# Altium PCB Ellis Huber Wearable device_CPU.PcbDoc (part 1 of 3)
Units mm, origin at the board's own origin, x right, y up, seen from the top; angles counter-clockwise.
Board outline 45 x 35 mm, 4 copper layers (Top Layer, Ground, Power, Bottom Layer), stack 1.586 mm thick; 117 components, 85 nets, 387 pads, 159 vias.
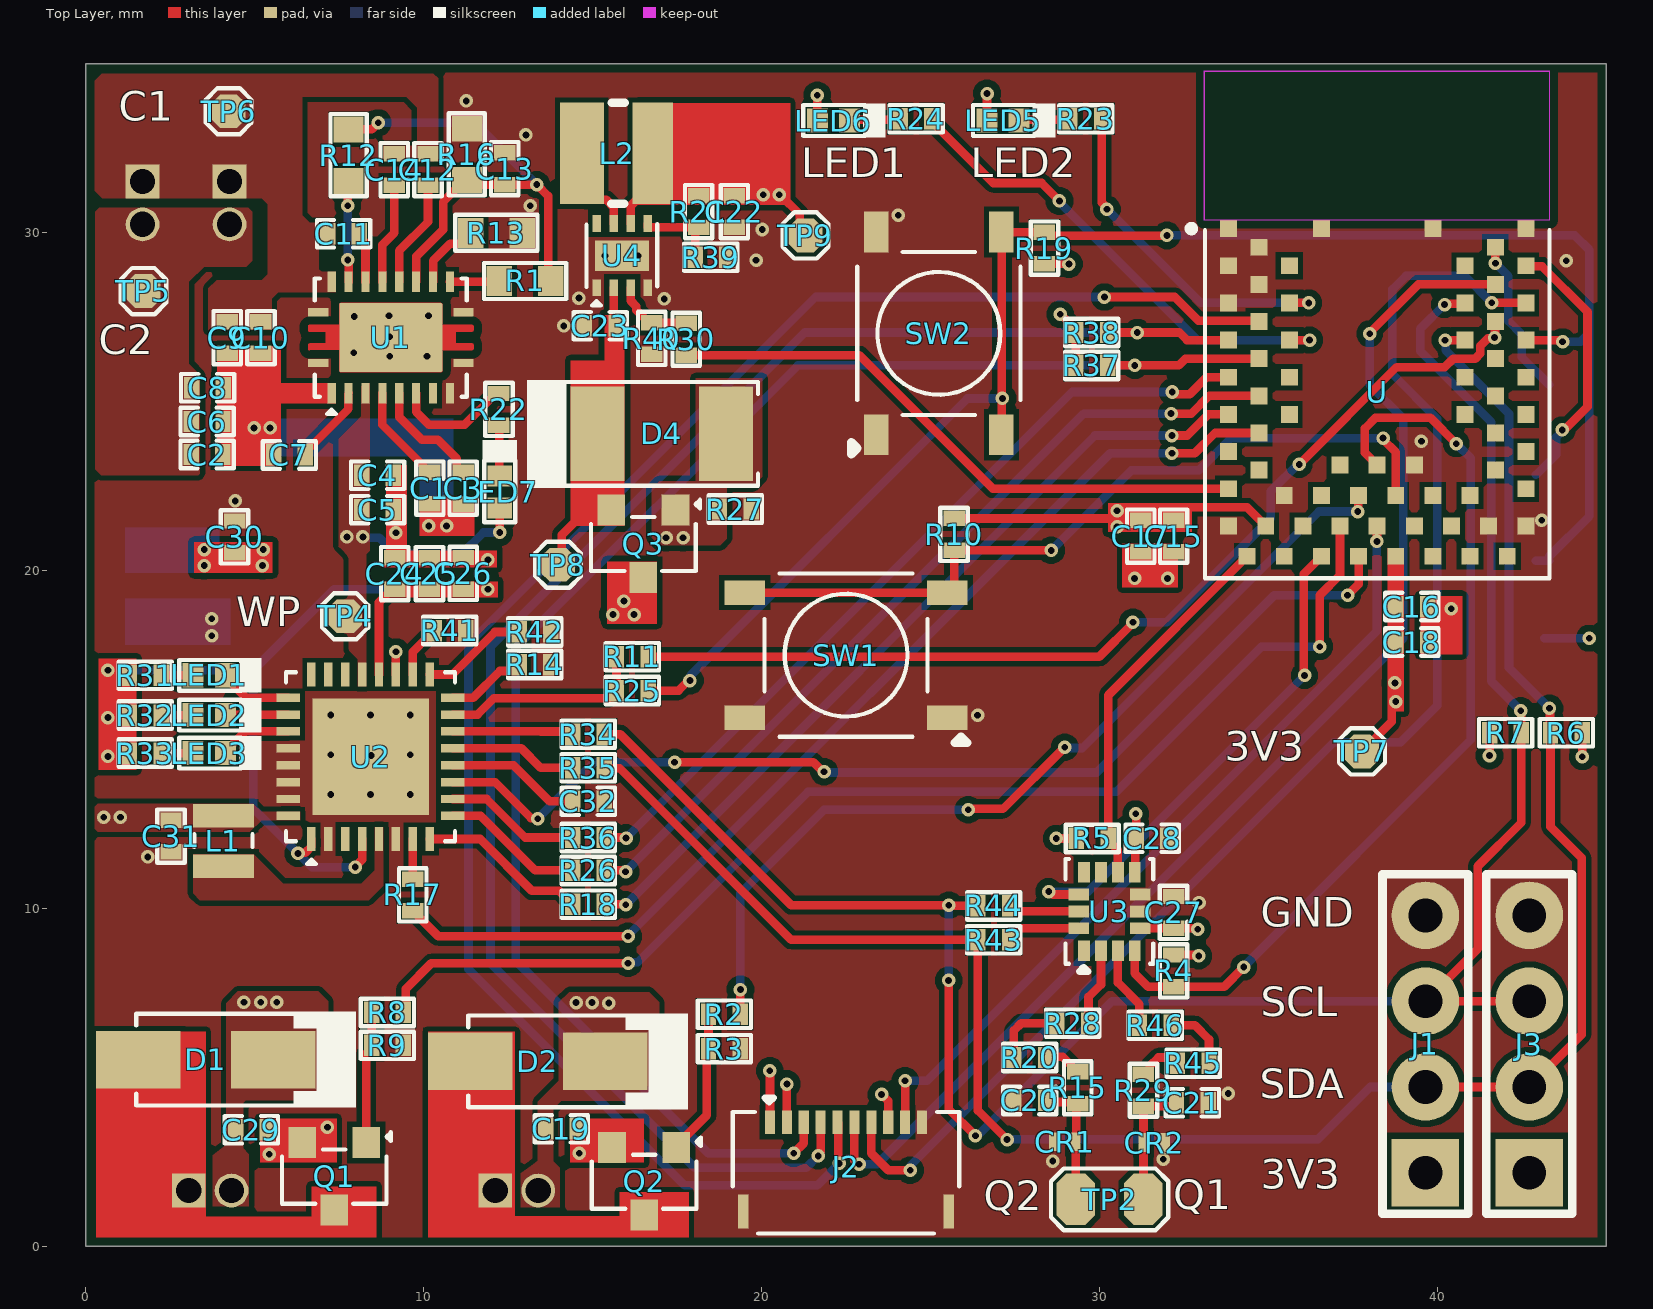
[diagram p0: Top Layer view]
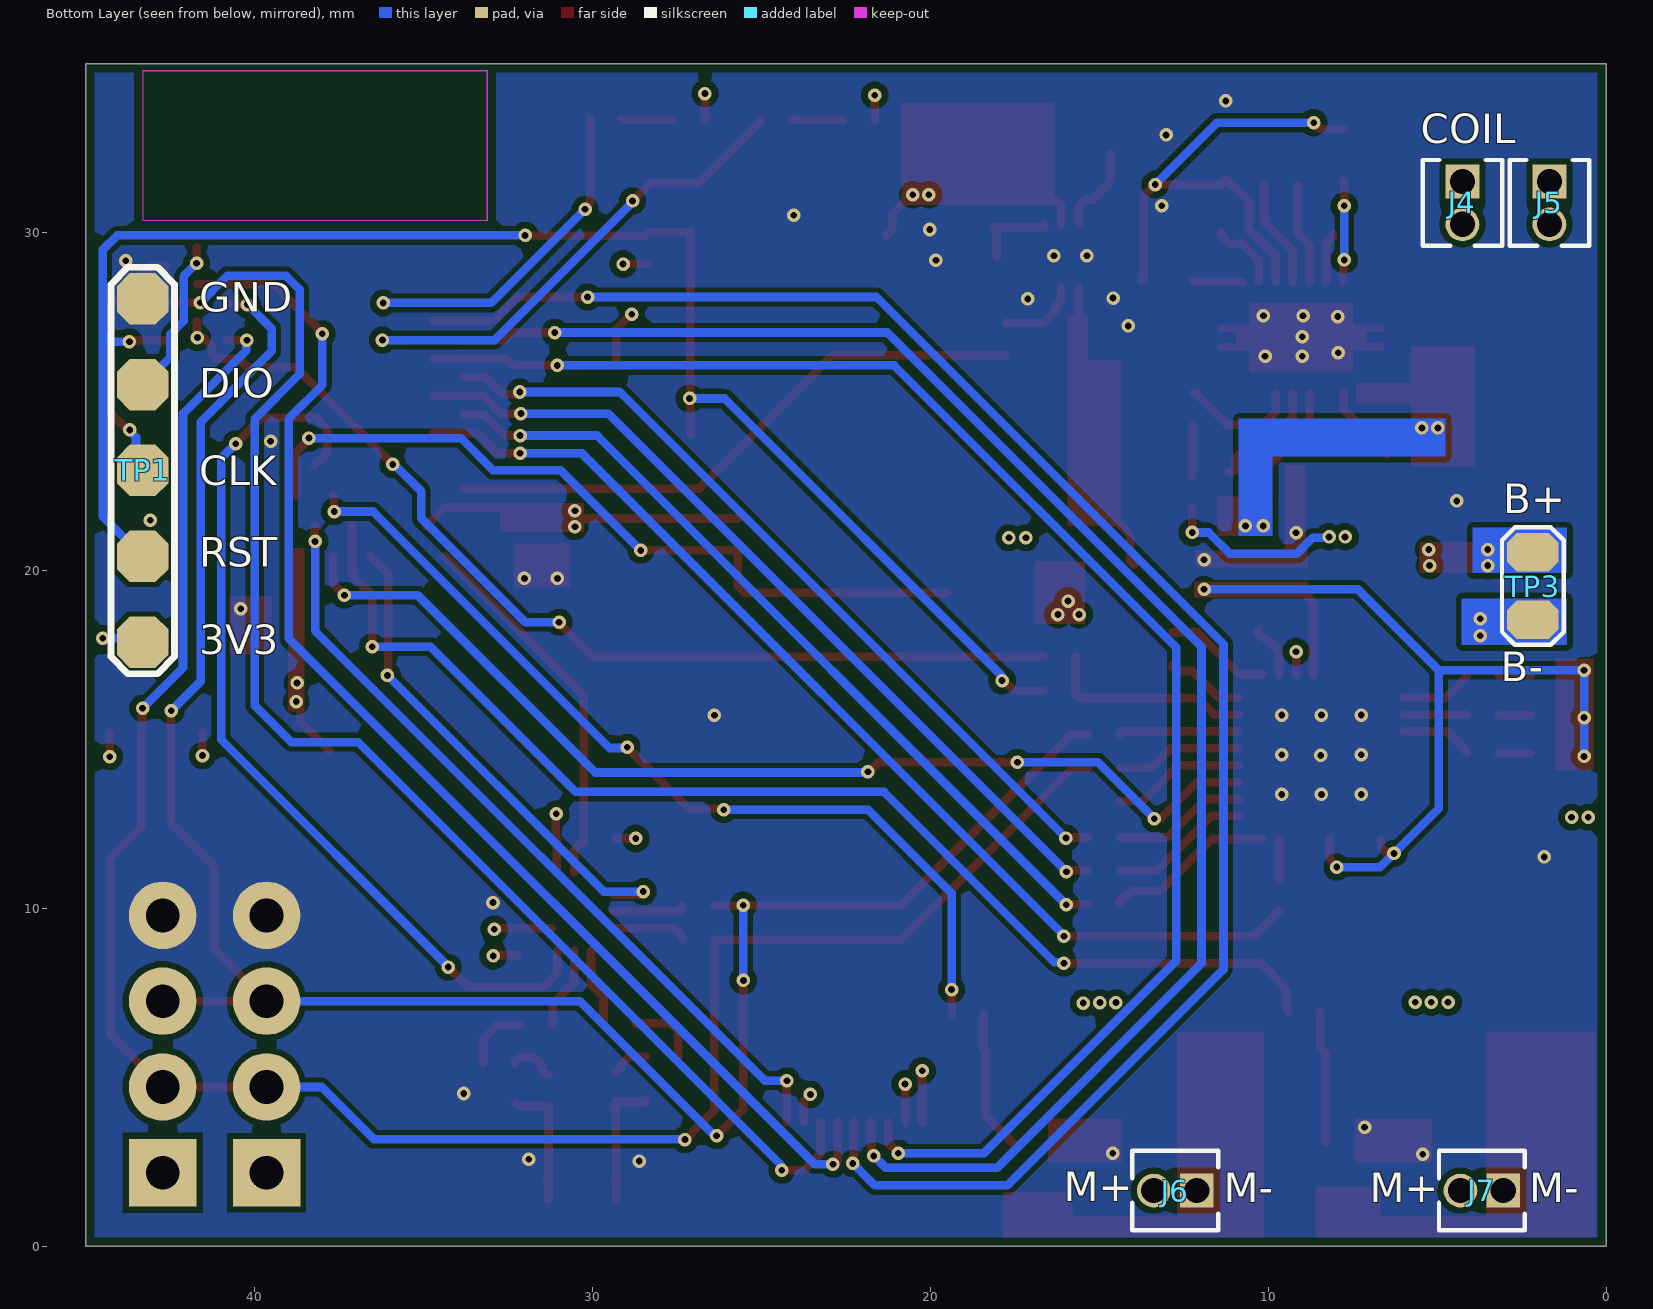
[diagram p1: Bottom Layer view, seen from below]
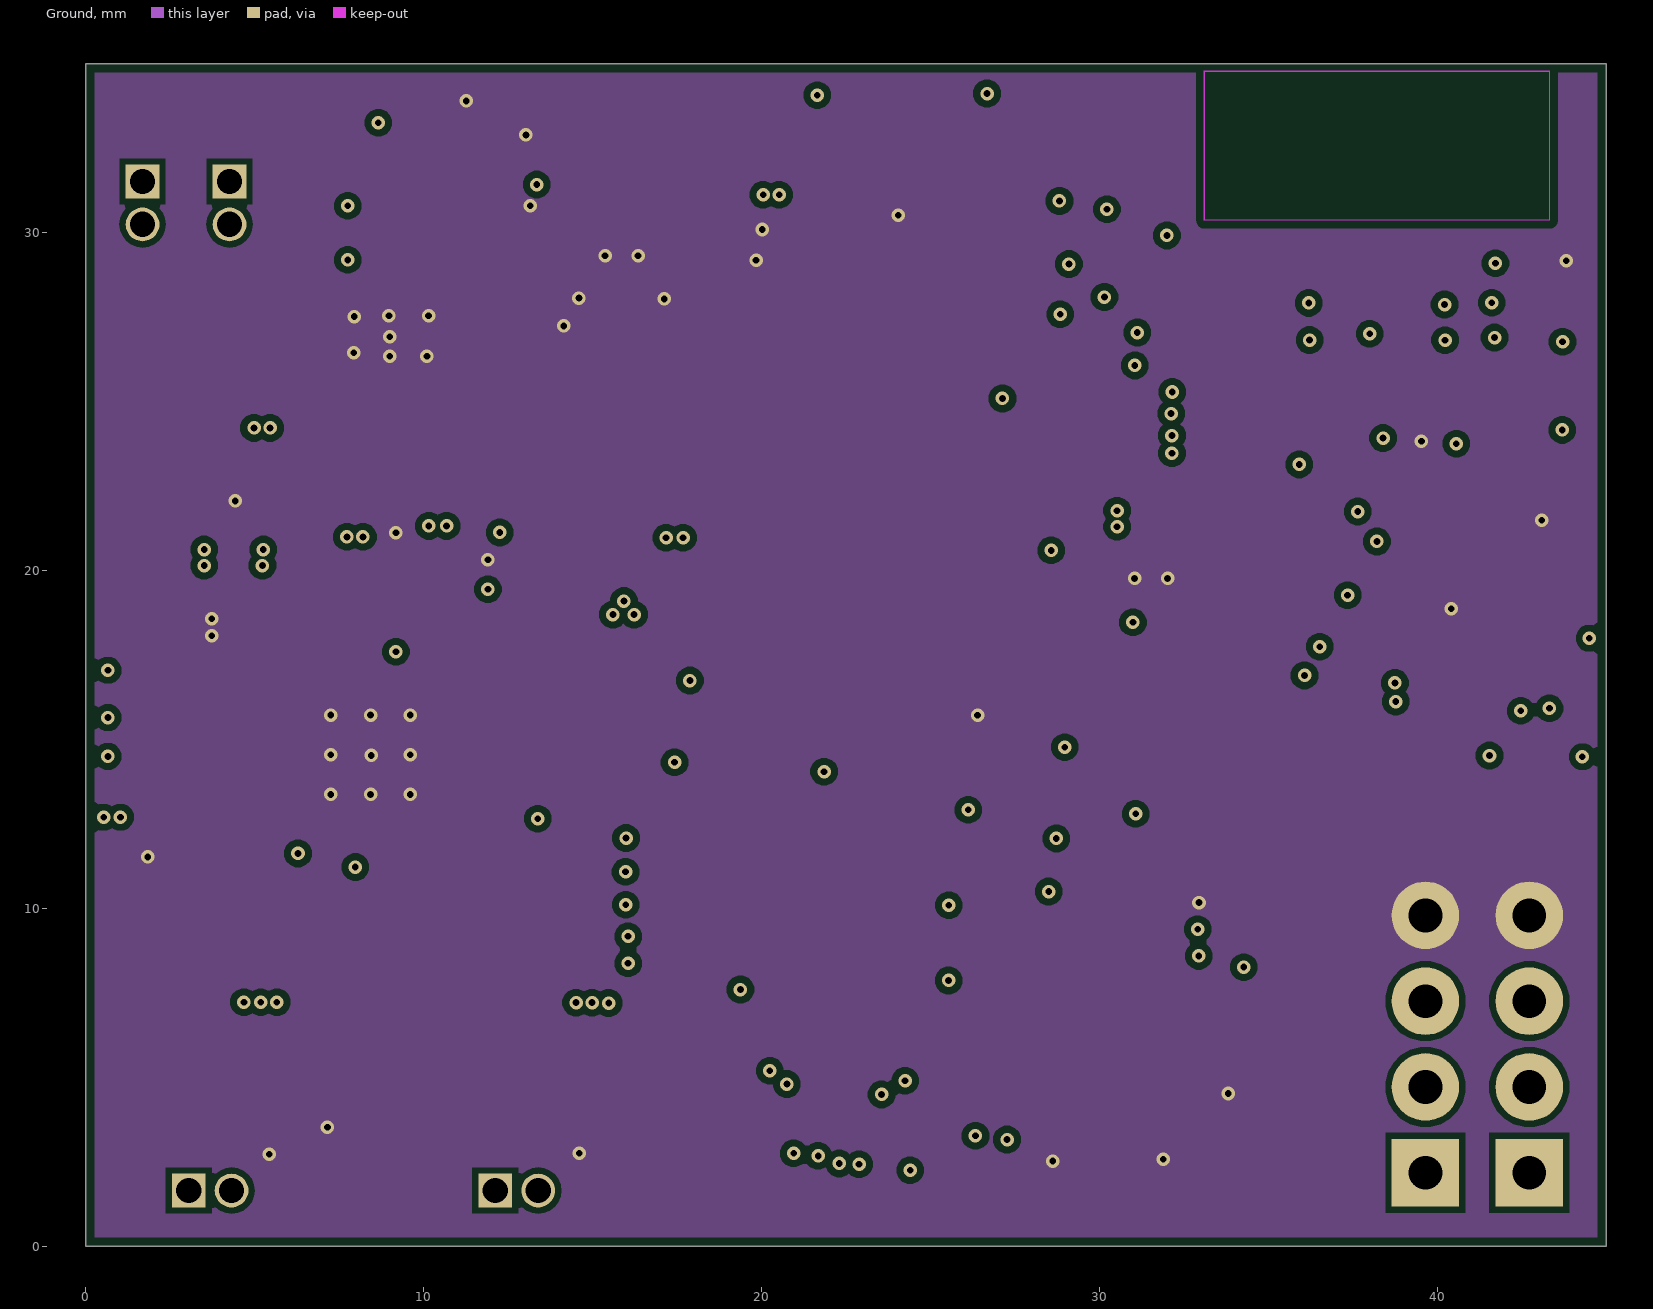
[diagram p2: Ground]
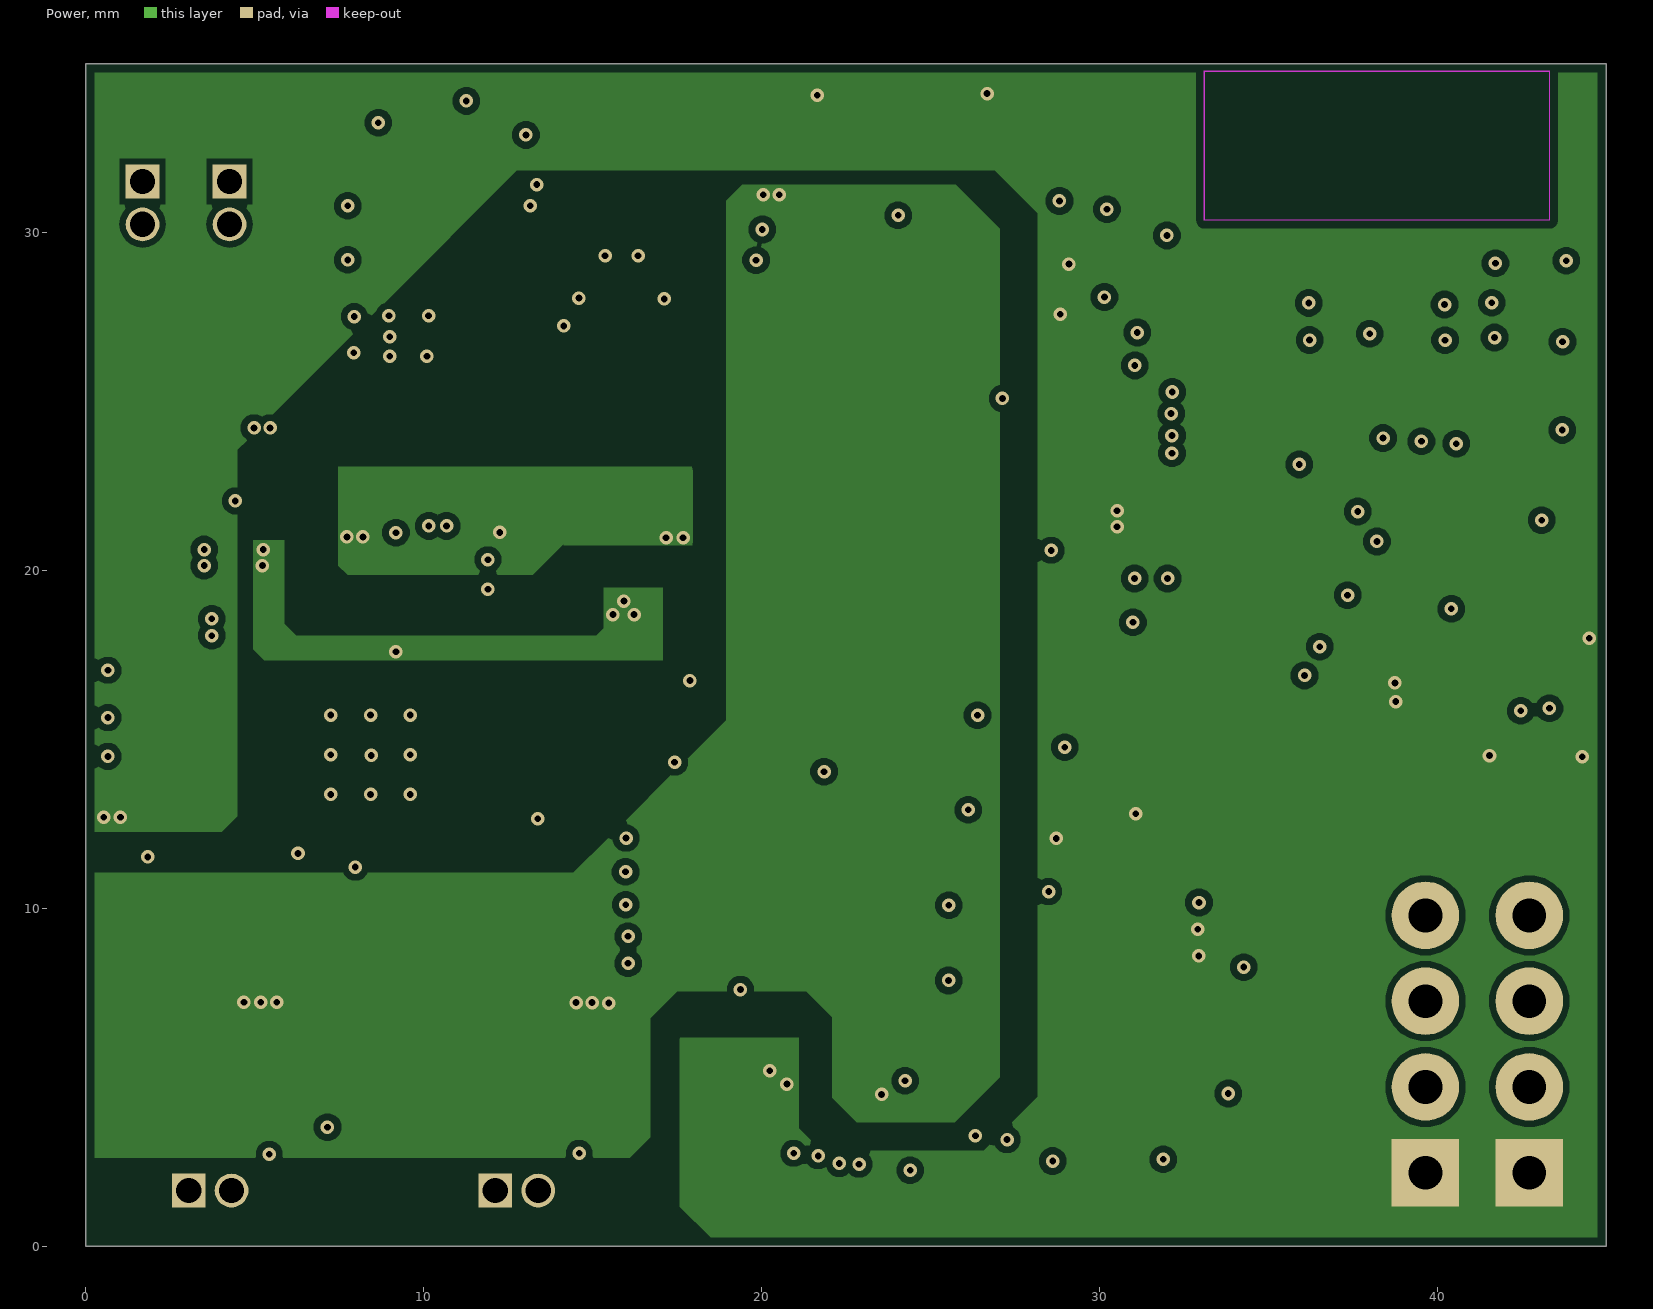
[diagram p3: Power]
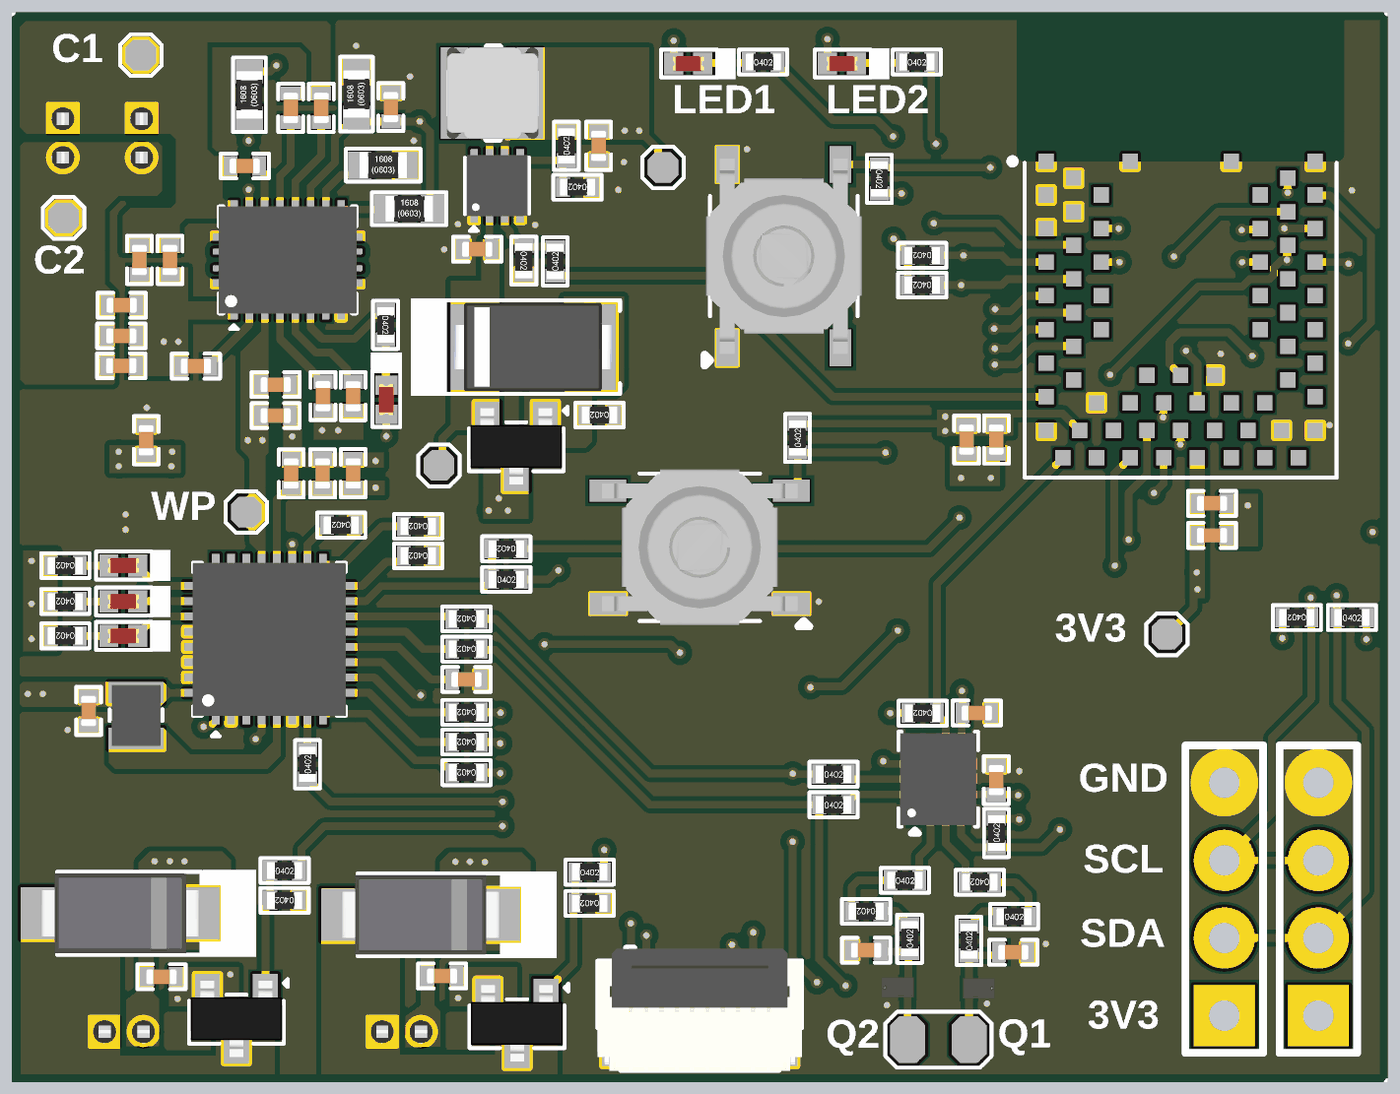
[diagram p5: 3D render of the assembled board from above, using the file's embedded part models]
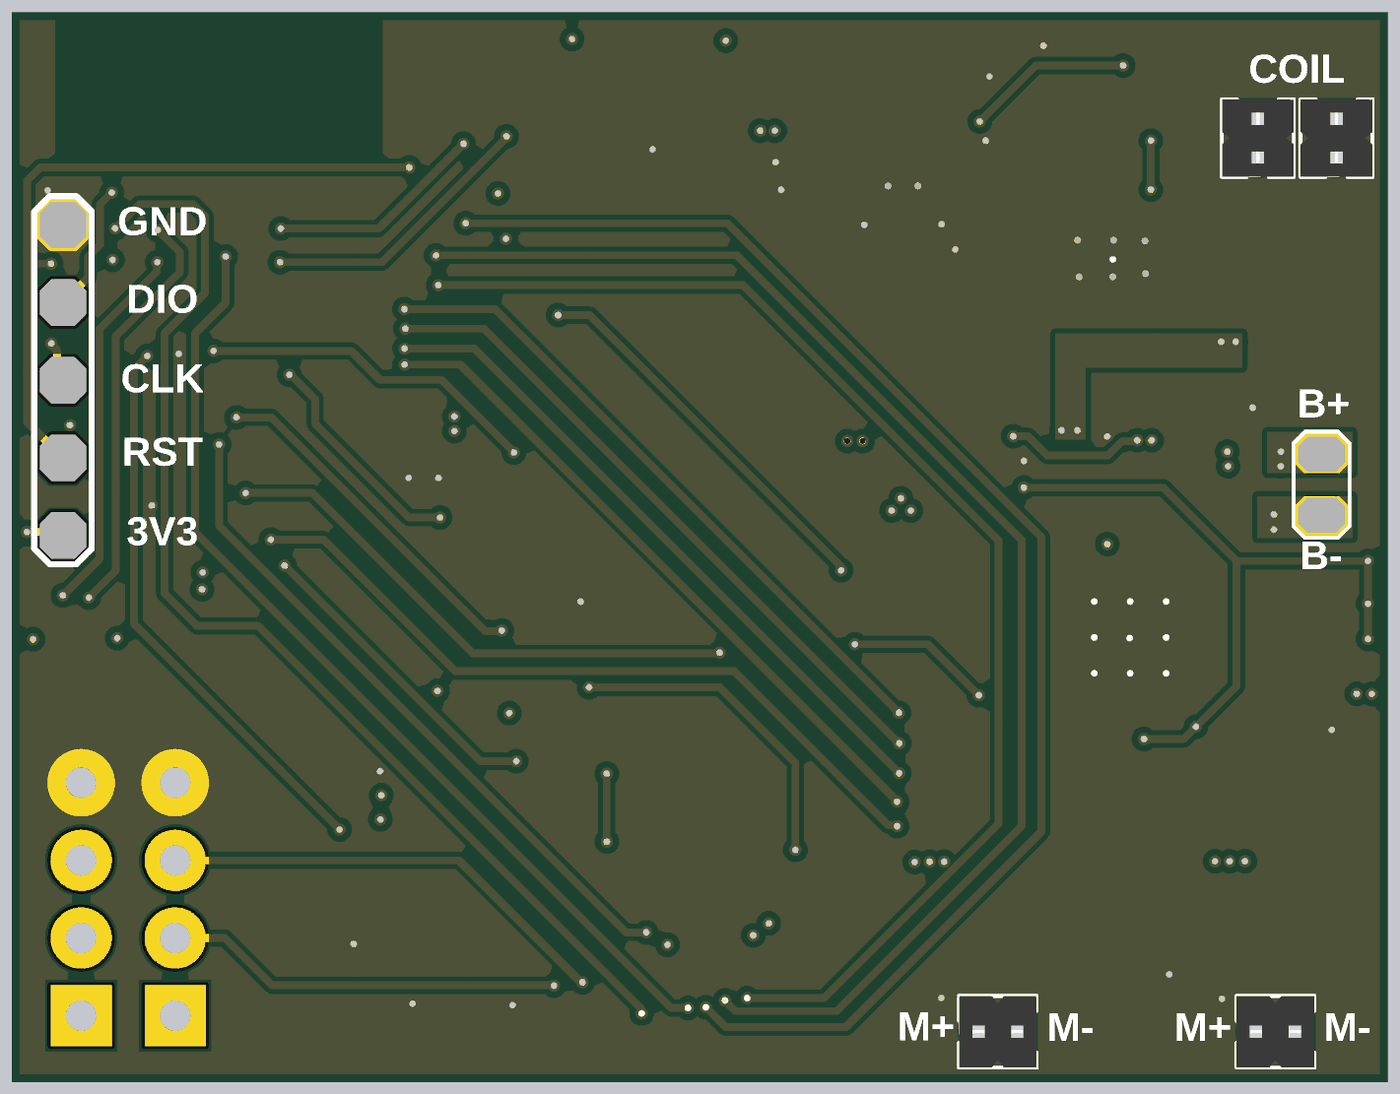
[diagram p6: 3D render of the assembled board from below, using the file's embedded part models]

## Layer stack, top to bottom
Top Solder: solder mask 0.0102, Solder Resist, Dk 3.8
Top Layer: signal copper 0.035
Dielectric 2: prepreg 0.2104, PP-006, Dk 4.4
Ground: signal copper 0.0152
Dielectric 1: core 1.065, FR-4, Dk 4.6
Power: signal copper 0.0152
Dielectric 3: prepreg 0.2104, PP-006, Dk 4.4
Bottom Layer: signal copper 0.035
Bottom Solder: solder mask 0.0102, Solder Resist, Dk 3.8

## Board outline
0,0 0,35 45,35 45,0

## Design rules (kind name [scope] priority, off if disabled: settings)
BoardOutlineClearance [All] p1: gap=0 ignorepadtopadclearanceinfootprint=FALSE except(0.254: Fill-OutlineEdge Poly-OutlineEdge Region-OutlineEdge)
Clearance [All] p1: gap=0.254 ignorepadtopadclearanceinfootprint=FALSE except(0: Arc-Hole Track-Hole SMDPad-Hole THPad-Hole Via-Hole Fill-Hole Poly-Hole Region-Hole Text-Hole; 0.127: Arc-SMDPad Arc-Text Track-SMDPad SMDPad-SMDPad SMDPad-Fill Via-Fill Region-Region Text-Text; 0.152: Arc-Arc Arc-Track Arc-Poly Track-Track Track-Poly SMDPad-Poly Fill-Poly Poly-Poly; 0.178: Arc-Via Arc-Region Track-Via SMDPad-Via THPad-Via THPad-Poly Via-Via; 0.203: Via-Poly)
ComponentClearance [All] p1: gap=0 collisioncheckmode=3 verticalgap=0 showdistances=FALSE
MinimumSolderMaskSliver [All] p1: minsoldermaskwidth=0.025
PlaneConnect [All] p1: planeconnectstyle=Direct reliefexpansion=0.508 reliefentries=4 reliefconductorwidth=0.254 reliefairgap=0.254
PolygonConnect [All] p1: connectstyle=Direct reliefconductorwidth=0.254 reliefentries=4 polygonreliefangle="90 Angle" airgapwidth=0.254
RoutingVias [All] p1: holewidth=0.2 width=0.4 viastyle="Through Hole" minholewidth=0.2 minwidth=0.4 maxholewidth=0.2 maxwidth=0.4
SilkToSilkClearance [All] p1: silktosilkclearance=0
SilkToSolderMaskClearance [IsPad] p1: minsilkscreentomaskgap=0.003 clearancetoexposedcopper=TRUE
SolderMaskExpansion [All] p1: expansion=0.102 istentingtop=FALSE
SupplyNets "Schematic Supply Nets_4" [InNet('W_Power')] p1: voltage=0.000
SupplyNets "Schematic Supply Nets_3" [InNet('BAT+')] p2: voltage=0.000
SupplyNets "Schematic Supply Nets_2" [InNet('VOS')] p3: voltage=0.000
SupplyNets "Schematic Supply Nets_1" [InNet('+3V3')] p4: voltage=0.000
SupplyNets "Schematic Supply Nets" [InNet('GND')] p5: voltage=0.000
Width [All] p1: maxlimit=0.762 minlimit=0.127 preferedwidth=0.254 midlayer2_maxwidth=0.254 bottomlayer_minwidth=0.254 bottomlayer_maxwidth=0.254 minimp=50.000000 maximp=50.000000 favimp=50.000000
25 further rules are at their usual default settings.

## Classes and differential pairs
component class Wireless_Charging: C1 C2 C3 C4 C5 C6 C7 C8 C9 C10 C11 C12 C13 C14 J4 J5 LED7 R1 R12 R13 R16 R22 TP4 TP5 TP6 U1
component class Power_Management: C22 C23 C24 C25 C26 C30 C31 C32 D4 L1 L2 LED1 LED2 LED3 Q3 R14 R21 R27 R30 R31 R32 R33 R34 R35 R39 R40 R41 R42 TP3 TP8 TP9 U2 U4
component class Motor_Driver: C19 C29 D1 D2 J6 J7 Q1 Q2 R2 R3 R8 R9
component class MCU: C15 C16 C17 C18 J1 J2 J3 LED5 LED6 R6 R7 R10 R11 R17 R18 R19 R23 R24 R25 R26 R36 R37 R38 SW1 SW2 TP1 TP7 U
component class IMU: C20 C21 C27 C28 CR1 CR2 R4 R5 R15 R20 R28 R29 R43 R44 R45 R46 TP2 U3

## Components (designator, comment, footprint, x,y, rotation, side; value= is the part's Value field where it differs from the comment)
C1 "470nF" Cap-0402 10.181,22.445 r90 top
C2 "68nF" Cap-0402 3.584,23.438 r0 top
C3 "22nF" Cap-0402 11.166,22.442 r90 top
C4 "0.1uF" Cap-0402 8.633,22.822 r180 top
C5 "1uF" Cap-0402 8.633,21.806 r180 top
C6 "68nF" Cap-0402 3.587,24.415 r0 top
C7 "10nF" Cap-0402 6.025,23.425 r0 top
C8 "47nF" Cap-0402 3.601,25.417 r0 top
C9 "1.8nF" Cap-0402 4.181,26.9 r270 top
C10 "100pF" Cap-0402 5.181,26.9 r270 top
C11 "10nF" Cap-0402 7.625,29.975 r0 top
C12 "22nF" Cap-0402 10.125,31.875 r270 top
C13 "0.1uF" Cap-0402 12.4,31.9 r270 top
C14 "470nF" Cap-0402 9.125,31.875 r270 top
C15 "0.1uF" Cap-0402 32.2,21.025 r90 top
C16 "0.1uF" Cap-0402 39.25,18.935 r180 top
C17 "4.7uF" Cap-0402 31.225,21.025 r90 top
C18 "4.7uF" Cap-0402 39.25,17.885 r180 top
C19 "0.1uF" Cap-0402 14.075,3.475 r180 top
C20 "100pF" Cap-0402 27.94,4.318 r0 top
C21 "100pF" Cap-0402 32.754,4.249 r180 top
C22 "22uF" Cap-0402 19.195,30.632 r90 top
C23 "10uF" Cap-0402 15.225,27.25 r0 top
C24 "10uF" Cap-0402 9.143,19.914 r270 top
C25 "10uF" Cap-0402 10.168,19.914 r270 top
C26 "10uF" Cap-0402 11.168,19.919 r270 top
C27 "0.1uF" Cap-0402 32.196,9.884 r270 top
C28 "0.1uF" Cap-0402 31.559,12.077 r180 top
C29 "0.1uF" Cap-0402 4.9,3.45 r180 top
C30 "2.2uF" Cap-0402 4.4,21 r270 top
C31 "10uF" Cap-0402 2.518,12.144 r90 top
C32 "0.1uF" Cap-0402 14.875,13.175 r180 top
CR1 "ESDALCL5-1BM2" CR_L5-1BM2_STM 28.976,3.093 r0 top
CR2 "ESDALCL5-1BM2" CR_L5-1BM2_STM 31.626,3.068 r180 top
D1 "SS24A" SMA 3.55,5.525 r180 top
D2 "SS24A" SMA 13.375,5.475 r180 top
D4 "SS14" SMA(DO-214AC) 17.05,24.05 r0 top
J1 "DNP" "4P Through Hole Pads" 39.704,3.979 r90 top
J2 "503480-1000" 5034801000 22.5,2.35 r0 top
J3 "DNP" "4P Through Hole Pads" 42.778,3.979 r90 top
J4 "COIL2" "HDR 1x2 Male 1.27mm" 4.25,30.885 r270 bottom
J5 "COIL1" "HDR 1x2 Male 1.27mm" 1.675,30.885 r270 bottom
J6 "VL91022-160-320H" "HDR 1x2 Male 1.27mm" 12.753,1.65 r0 bottom
J7 "VL91022-160-320H" "HDR 1x2 Male 1.27mm" 3.675,1.65 r0 bottom
L1 "2.2uH" MAKK2016T2R2M_ 4.068,11.994 r270 top
L2 "2.2uH" NR3015T2R2M 15.729,32.358 r0 top
LED1 "Red" LED-0402 3.65,16.9 r0 top
LED2 "Red" LED-0402 3.65,15.725 r0 top
LED3 "Red" LED-0402 3.65,14.6 r0 top
LED5 "Red" LED-0402 27.15,33.325 r0 top
LED6 "Red" LED-0402 22.125,33.325 r0 top
LED7 "Red" LED-0402 12.25,22.325 r90 top
Q1 "AO3400A" sot-23 7.35,2.075 r180 top
Q2 "AO3400A" sot-23 16.525,1.925 r180 top
Q3 "AO3401" SOT-23 16.5,20.8 r180 top
R1 "110R" Res-0603 13,28.575 r180 top value=1R
R2 "100R" Res-0402 18.9,6.87 r0 top
R3 "100K" Res-0402 18.9,5.85 r180 top
R4 "10K" Res-0402 32.2,8.152 r90 top
R5 "10K" Res-0402 29.791,12.071 r180 top
R6 "10K" Res-0402 43.825,15.2 r0 top
R7 "10K" Res-0402 42.025,15.2 r180 top
R8 "100R" Res-0402 8.925,6.923 r0 top
R9 "100K" Res-0402 8.925,5.948 r180 top
R10 "10K" Res-0402 25.7,21.075 r90 top
R11 "0R" Res-0402 16.175,17.45 r180 top
R12 "42.2k" Res-0603 7.775,32.3 r270 top value=1R
R13 "10K" Res-0603 12.15,30 r180 top value=10kR
R14 "330K" Res-0402 13.293,17.219 r180 top value=330kR
R15 "200R" Res-0402 29.362,4.692 r90 top
R16 "200R" Res-0603 11.275,32.325 r270 top
R17 "0R" Res-0402 9.675,10.4 r90 top
R18 "0R" Res-0402 14.875,10.125 r180 top
R19 "10K" Res-0402 28.375,29.55 r270 top
R20 "200R" Res-0402 27.94,5.588 r180 top
R21 "1K" Res-0402 18.138,30.632 r90 top value=1kR
R22 "220R" Res-0402 12.225,24.775 r270 top
R23 "220R" Res-0402 29.6,33.375 r0 top
R24 "220R" Res-0402 24.575,33.376 r0 top
R25 "0R" Res-0402 16.175,16.45 r0 top
R26 "0R" Res-0402 14.875,11.125 r180 top
R27 "100K" Res-0402 19.225,21.825 r180 top
R28 "100R" Res-0402 29.21,6.604 r0 top
R29 "200R" Res-0402 31.304,4.617 r90 top
R30 "1K" Res-0402 17.77,26.851 r90 top value=1kR
R31 "220R" Res-0402 1.755,16.9 r180 top
R32 "220R" Res-0402 1.755,15.725 r180 top
R33 "220R" Res-0402 1.755,14.6 r180 top
R34 "0R" Res-0402 14.875,15.16 r180 top
R35 "0R" Res-0402 14.875,14.167 r180 top
R36 "0R" Res-0402 14.875,12.1 r180 top
R37 "10K" Res-0402 29.775,26.075 r180 top
R38 "10K" Res-0402 29.775,27.05 r180 top
R39 "300K" Res-0402 18.502,29.279 r180 top
R40 "100K" Res-0402 16.75,26.875 r270 top
R41 "0R" Res-0402 10.775,18.225 r180 top
R42 "0R" Res-0402 13.293,18.185 r180 top
R43 "0R" Res-0402 26.875,9.075 r0 top
R44 "0R" Res-0402 26.875,10.075 r0 top
R45 "200R" Res-0402 32.777,5.417 r0 top
R46 "100R" Res-0402 31.657,6.542 r180 top
SW1 "PTS526SP15SMTR2LFS" "PTS526SP15SMTR2 LFS" 22.5,17.5 r180 top
SW2 "PTS526SP15SMTR2LFS" "PTS526SP15SMTR2 LFS" 25.25,27.025 r90 top
TP1 "SWD" "5 Test Pad" 43.32,17.885 r90 bottom
TP2 "Qvar" "2 Test Pad" 31.304,1.389 r180 top
TP3 "BAT CONN" "2 Test Pad" 2.168,20.544 r270 bottom
TP4 "TEST POINT 0.5mm Dia" "Test-point - 0.5mm" 7.675,18.65 r90 top
TP5 "TEST POINT 0.5mm Dia" "Test-point - 0.5mm" 1.7,28.275 r90 top
TP6 "TEST POINT 0.5mm Dia" "Test-point - 0.5mm" 4.225,33.6 r90 top
TP7 "TEST POINT 0.5mm Dia" "Test-point - 0.5mm" 37.775,14.65 r90 top
TP8 "TEST POINT 0.5mm Dia" "Test-point - 0.5mm" 13.975,20.175 r90 top
TP9 "TEST POINT 0.5mm Dia" "Test-point - 0.5mm" 21.3,29.925 r90 top
U "BMD-340-A-R" RIGADO_BMD-340-A-R 38.225,27.275 r270 top
U1 "BQ51013BRHLR" "20-VQFN (3.5x4.5)" 9.025,26.9 r90 top
U2 "NPM1300-QEAA-R" "32-QFN (5x5)" 8.425,14.49 r90 top
U3 "LSM6DSV16XTR" "14-LGA (2.5x3)" 30.299,9.912 r90 top
U4 "TPS62162DSGR" 8-WSON(2x2) 15.875,29.325 r90 top

## Footprints (in the part's own frame and the unit in brackets; to place one, negate y for a bottom-side part, rotate by r counter-clockwise, add the part's x,y. Pads: shape width x height; smd on the part's side, far side on the other; paste and mask are expansions set on the pad)
"2 Test Pad" [mil]
  oct 45x60 smd: 1(0,0) 2(78.74,0)
  silkscreen extent -29,-36 108,36
"4P Through Hole Pads" [mm]
  rect 2x2 hole 1: 1(-1.803,0.051)
  round 2 hole 1: 2(0.737,0.051) 3(3.277,0.051) 4(5.817,0.051)
  silkscreen extent -3.02,-1.22 7.04,1.32
"5 Test Pad" [mil]
  oct 60x60 smd: 1(0,0) 2(100,0) 3(200,0) 4(300,0) 5(400,0)
  silkscreen extent -37,-37 437,37
8-WSON(2x2) [mm] "IC REG BUCK 3.3V 1A 8WSON"
  rect 0.5x0.25 smd: 1(-0.95,0.75) 2(-0.95,0.25) 3(-0.95,-0.25) 4(-0.95,-0.75) 5(0.95,-0.75) 6(0.95,-0.25) 7(0.95,0.25) 8(0.95,0.75)
  rect 0.9x1.6 smd: 9(0,0)
  silkscreen extent -1.47,-1.04 0.93,1.05, body extent -1,-1 1,1, height 0.8
"14-LGA (2.5x3)" [mm]
  rect 0.61x0.35 smd mask+0.05: 1(-1.16,0.75) 2(-1.16,0.25) 3(-1.16,-0.25) 4(-1.16,-0.75) 8(1.16,-0.75) 9(1.16,-0.25) 10(1.16,0.25) 11(1.16,0.75)
  rect 0.35x0.61 smd mask+0.05: 5(-0.5,-0.91) 6(0,-0.91) 7(0.5,-0.91) 12(0.5,0.91) 13(0,0.91) 14(-0.5,0.91)
  silkscreen extent -1.78,-1.3 1.55,1.3, body extent -1.5,-1.25 1.5,1.25, height 0.86
"20-VQFN (3.5x4.5)" [mm]
  rect 0.24x0.6 smd: 1(-0.75,2.15) 10(-0.75,-2.15) 11(0.75,-2.15) 20(0.75,2.15)
  rect 0.6x0.24 smd: 2(-1.65,1.75) 3(-1.65,1.25) 4(-1.65,0.75) 5(-1.65,0.25) 6(-1.65,-0.25) 7(-1.65,-0.75) 8(-1.65,-1.25) 9(-1.65,-1.75) 12(1.65,-1.75) 13(1.65,-1.25) 14(1.65,-0.75) 15(1.65,-0.25) 16(1.65,0.25) 17(1.65,0.75) 18(1.65,1.25) 19(1.65,1.75)
  rrect5% 2.05x3.05 smd paste-3: 21(0,0)
  Top Layer region: 381 vertices and 0 holes, not listed, extent -1.025,-2.45 1.025,2.45
  silkscreen extent -2.26,-2.25 1.75,2.25, body extent -1.75,-2.25 1.75,2.25, height 1
"32-QFN (5x5)" [mm]
  rect 0.7x0.25 smd: 1(-2.435,1.75) 2(-2.435,1.25) 3(-2.435,0.75) 4(-2.435,0.25) 5(-2.435,-0.25) 6(-2.435,-0.75) 7(-2.435,-1.25) 8(-2.435,-1.75) 17(2.435,-1.75) 18(2.435,-1.25) 19(2.435,-0.75) 20(2.435,-0.25) 21(2.435,0.25) 22(2.435,0.75) 23(2.435,1.25) 24(2.435,1.75)
  rect 0.25x0.7 smd: 9(-1.75,-2.435) 10(-1.25,-2.435) 11(-0.75,-2.435) 12(-0.25,-2.435) 13(0.25,-2.435) 14(0.75,-2.435) 15(1.25,-2.435) 16(1.75,-2.435) 25(1.75,2.435) 26(1.25,2.435) 27(0.75,2.435) 28(0.25,2.435) 29(-0.25,2.435) 30(-0.75,2.435) 31(-1.25,2.435) 32(-1.75,2.435)
  rect 3.45x3.45 smd paste-3: 33(0,0)
  silkscreen extent -3.17,-2.5 2.5,2.5, body extent -2.5,-2.5 2.5,2.5, height 0.6
5034801000 [mm]
  rect 0.3x0.7 smd: 1(-2.25,1.325) 2(-1.75,1.325) 3(-1.25,1.325) 4(-0.75,1.325) 5(-0.25,1.325) 6(0.25,1.325) 7(0.75,1.325) 8(1.25,1.325) 9(1.75,1.325) 10(2.25,1.325)
  rect 0.3x1 smd: S1(-3.04,-1.325) S2(3.04,-1.325)
  silkscreen extent -3.35,-1.97 3.35,2.04, body extent -3.35,-1.98 3.35,2.02, height 1.02
Cap-0402 [mil]
  rect 18x25 smd mask+2.36: 1(-18.5,0) 2(18.5,0)
  silkscreen extent -31,-16 31,16, body extent -20,-10 20,10, height 19
CR_L5-1BM2_STM [mil]
  rect 12x22 smd paste+0 mask+0: 1(-12.5,0)
  rect 12x22 smd paste+0 mask-1: 2(12.5,0)
  body extent -21,-13 21,13, height 20
"HDR 1x2 Male 1.27mm" [mm]
  rect 1x1 hole 0.75 paste-2539.97 mask+0.051: 1(-0.635,0)
  round 1 hole 0.75 paste-2539.97 mask+0.051: 2(0.635,0)
  silkscreen extent -1.27,-1.18 1.27,1.18, body extent -1.27,-1.17 1.28,1.17, height 5.6
LED-0402 [mm]
  rect 0.62x0.72 smd: 1(-0.475,0) 2(0.475,0)
  silkscreen extent -0.89,-0.51 1.55,0.51, body extent -0.5,-0.25 0.51,0.25, height 0.45
MAKK2016T2R2M_ [mm]
  rect 0.7x1.8 smd: 1(-0.75,0) 2(0.75,0)
  silkscreen extent -0.2,-0.86 0.18,0.86, body extent -1,-0.8 1,0.8, height 1
NR3015T2R2M [mm]
  rect 1.3x3 smd paste+0 mask+0.051: 1(-1.05,0)
  rect 1.2x3 smd paste+0 mask+0.051: 2(1.05,0)
  silkscreen extent -0.18,-1.5 0.22,1.5, body extent -1.51,-1.5 1.51,1.5, height 1.51
"PTS526SP15SMTR2 LFS" [mm]
  rect 1.2x0.72 smd paste+0 mask+0.051: 1(-3,1.85) 2(3,1.85) 3(-3,-1.85) 4(3,-1.85)
  silkscreen extent -3.58,-2.41 2.41,2.59, body extent -3.2,-2.55 3.2,2.55, height 1.5
Res-0402 [mil]
  rect 18x25 smd mask+2.17: 1(-18.5,0) 2(18.5,0)
  silkscreen extent -32,-17 32,16, body extent -23,-11 23,11, height 16
Res-0603 [mil]
  rect 30x35 smd: 1(-30,0) 2(30,0)
  silkscreen extent -48,-21 48,21, body extent -31,-17 31,17, height 18
RIGADO_BMD-340-A-R [mm]
  rect 0.5x0.5 smd: 1(-2.85,-4.4) 2(-2.3,-3.5) 3(-1.75,-4.4) 4(-1.2,-3.5) 5(-0.65,-4.4) 6(-0.1,-3.5) 7(0.45,-4.4) 8(1,-3.5) 9(1.55,-4.4) 10(2.1,-3.5) 11(2.65,-4.4) 12(3.2,-3.5) 13(3.75,-4.4) 14(4.3,-3.5) 15(4.85,-4.4) 16(5.95,-4.4) 17(5.95,-3.3) 18(5.05,-2.75) 19(5.95,-2.2) 20(5.05,-1.65) 21(5.95,-1.1) 22(5.05,-0.55) 23(5.95,0) 24(5.05,0.55) 25(5.95,1.1) 26(5.05,1.65) 27(5.95,2.2) 28(5.05,2.75) 29(5.95,3.3) 30(5.95,4.4) 31(4.85,4.4) 32(4.3,3.5) 33(3.75,4.4) 34(3.2,3.5) 35(2.65,4.4) 36(2.1,3.5) 37(1.55,4.4) 38(1,3.5) 39(0.45,4.4) 40(-0.1,3.5) 41(-0.65,4.4) 42(-1.2,3.5) 43(-1.75,4.4) 44(-2.3,3.5) 45(-2.85,4.4) 46(-2.85,1.65) 47(-2.85,-1.65) 48(-1.75,-2.6) 49(-0.65,-2.6) 50(0.45,-2.6) 51(1.55,-2.6) 52(2.65,-2.6) 53(4.15,-1.1) 54(4.15,0) 55(4.15,1.1) 56(2.65,2.6) 57(1.55,2.6) 58(0.45,2.6) 59(-0.65,2.6) 60(-1.75,2.6) 61(6.85,-3.85) 62(6.85,-2.75) 63(6.85,-1.65) 64(6.85,-0.55) 65(6.85,0.55) 66(6.85,1.65) 67(6.85,2.75) 68(6.85,3.85)
  Keep-Out Layer region: -3.1,-5.113 -7.519,-5.113 -7.519,5.1 -3.1,5.1
  Keep-Out Layer region: -3.1,-5.108 -7.512,-5.108 -7.512,5.1 -3.1,5.1
  silkscreen extent -2.95,-5.6 7.5,5.1
SMA [mm]
  rect 2.5x1.7 smd: 1(-2,0) 2(2,0)
  silkscreen extent -4.45,-1.42 2.06,1.42, body extent -2.6,-1.3 2.6,1.3, height 2.4
SMA(DO-214AC) [mm]
  rect 1.6x2.8 smd: 1(-1.9,0) 2(1.9,0)
  silkscreen extent -3.99,-1.6 2.84,1.6, body extent -2.6,-1.45 2.6,1.45, height 2.3
sot-23 [mm] "TRANS NPN 40V 0.6A SOT23"
  rect 0.82x0.92 smd: 1(-0.95,-1) 2(0.95,-1) 3(0,1)
  silkscreen extent -1.68,-1.3 1.55,0.81, body extent -1.5,-1.25 1.5,1.25, height 1.05
SOT-23 [mm] "TRANS NPN 40V 0.6A SOT23"
  rect 0.82x0.92 smd: 1(-0.95,-1) 2(0.95,-1) 3(0,1)
  silkscreen extent -1.68,-1.3 1.55,0.81, body extent -1.5,-1.25 1.5,1.25, height 1.05
"Test-point - 0.5mm" [mm]
  oct 1x1 smd: 1(0,0)
  silkscreen extent -0.68,-0.68 0.68,0.68

## Part data
C1 C14: library part GRM155R61H474KE11D, "CAP CER 0.47UF 50V X5R 0402", Case Code (Imperial)=0402, Case Code (Metric)=1005, Dielectric=X5R, LCSC Part Number=C437527, Manufacturer=Murata, Max Operating Temperature=85°C, Min Operating Temperature=-55°C, Tolerance=10%, Voltage Rating=50V, Case/Package=0402, ComponentLink1Description=https://datasheet.octopart.com/GRM155R61H474KE11D-Murata-datasheet-149523035.pdf?src-supplier=Newark, ComponentLink1URL=https://datasheet.octopart.com/GRM155R61H474KE11D-Murata-datasheet-149523035.pdf?src-supplier=Newark, ComponentLink2Description=https://datasheet.octopart.com/GRM155R61H474KE11D-Murata-datasheet-99353828.pdf?src-supplier=Future+Electronics, ComponentLink2URL=https://datasheet.octopart.com/GRM155R61H474KE11D-Murata-datasheet-99353828.pdf?src-supplier=Future+Electronics, ComponentLink3Description=http://search.murata.co.jp/Ceramy/image/img/A01X/G101/ENG/GRM155R61H474KE11-01.pdf?src-supplier=Digikey, ComponentLink3URL=http://search.murata.co.jp/Ceramy/image/img/A01X/G101/ENG/GRM155R61H474KE11-01.pdf?src-supplier=Digikey, ComponentLink4Description=https://search.murata.co.jp/Ceramy/image/img/A01X/G101/ENG/GRM155R61H474KE11-01.pdf?src-supplier=Digikey, ComponentLink4URL=https://search.murata.co.jp/Ceramy/image/img/A01X/G101/ENG/GRM155R61H474KE11-01.pdf?src-supplier=Digikey, ComponentLink5Description=https://datasheet.octopart.com/GRM155R61H474KE11D-Murata-datasheet-118179445.pdf?src-supplier=LCSC, ComponentLink5URL=https://datasheet.octopart.com/GRM155R61H474KE11D-Murata-datasheet-118179445.pdf?src-supplier=LCSC, ComponentLink6Description=https://datasheet.octopart.com/GRM155R61H474KE11D-Murata-datasheet-165579666.pdf?src-supplier=TME, ComponentLink6URL=https://datasheet.octopart.com/GRM155R61H474KE11D-Murata-datasheet-165579666.pdf?src-supplier=TME, Height=600um, Item Type=Capacitors, Length=1mm, Manufacturer Part Number=GRM155R61H474KE11D, Material=4241ConductorMaterial, Mounting Technology="Surface Mount", Packaging="Cut Tape", Pricing="7407=0.0141, 15000=0.01 (USD)", RoHS=Yes, RoHS Compliant=Yes, Series=GRM, Stock=22879, Supplier="Arrow Electronics", Thickness=500um, Voltage Rating (DC)=50V, Width=500um
C2 C6: library part CC0402KRX7R9BB683, "CAP CER 0.068UF 50V X7R 0402", Case/Package=343Case, Dielectric=1511DielectricType, Manufacturer=Yageo, Supplier Part Number 1=2106471, Voltage Rating (DC)=50V, Capacitance=68nF, Category="Ceramic Capacitors", Halogen Free=5694HalogenFree, Item Type=Capacitor, Lead Free=5697LeadFree, Manufacturer Part Number=CC0402KRX7R9BB683, Pricing 1="10000=0.0035, 40000=0.0033, 100000=0.0032, 250000=0.0031, 400000=0.0029 (USD)", RoHS=Yes, Stock 1=100000, Supplier 1="Future Electronics"
C3 C12: library part GRM155R71H223KA12D, "CAP CER 0.022UF 50V X7R 0402", LCSC Part Number=C77023, Manufacturer=Murata, ComponentLink1Description=https://datasheet.ciiva.com/18184/getdatasheetpartid-178940-18184738.pdf?src-supplier=Verical, ComponentLink1URL=https://datasheet.ciiva.com/18184/getdatasheetpartid-178940-18184738.pdf?src-supplier=Verical, ComponentLink2Description=https://datasheet.ciiva.com/11789/0900766b80ef921d-11789142.pdf?src-supplier=Rs, ComponentLink2URL=https://datasheet.ciiva.com/11789/0900766b80ef921d-11789142.pdf?src-supplier=Rs, ComponentLink3Description=https://datasheet.ciiva.com/29199/454297-da-01-en-vs-kondensator-0402-29199766.pdf?src-supplier=Conrad, ComponentLink3URL=https://datasheet.ciiva.com/29199/454297-da-01-en-vs-kondensator-0402-29199766.pdf?src-supplier=Conrad, ComponentLink4Description=https://datasheet.ciiva.com/131/partnumbering-e-01-131078.pdf?src-supplier=Digikey, ComponentLink4URL=https://datasheet.ciiva.com/131/partnumbering-e-01-131078.pdf?src-supplier=Digikey, ComponentLink5Description=https://datasheet.ciiva.com/131/partnumbering-e-01-131079.pdf?src-supplier=Digikey, ComponentLink5URL=https://datasheet.ciiva.com/131/partnumbering-e-01-131079.pdf?src-supplier=Digikey, ComponentLink6Description=https://datasheet.ciiva.com/131/partnumbering-e-01-131080.pdf?src-supplier=Digikey, ComponentLink6URL=https://datasheet.ciiva.com/131/partnumbering-e-01-131080.pdf?src-supplier=Digikey, ComponentLink7Description=https://datasheet.ciiva.com/16440/l0005e-16440589.pdf?src-supplier=Future+Electronics, ComponentLink7URL=https://datasheet.ciiva.com/16440/l0005e-16440589.pdf?src-supplier=Future+Electronics, ComponentLink8Description=https://datasheet.ciiva.com/22698/608985-22698424.pdf?src-supplier=Element14, ComponentLink8URL=https://datasheet.ciiva.com/22698/608985-22698424.pdf?src-supplier=Element14, ComponentLink9Description=https://datasheet.ciiva.com/7937/608985-7937629.pdf?src-supplier=Element14, ComponentLink9URL=https://datasheet.ciiva.com/7937/608985-7937629.pdf?src-supplier=Element14, Item Type=Capacitors, Lead Free=5697LeadFree, Manufacturer Part Number=GRM155R71H223KA12D, Pricing="30000=0.0033, 50000=0.0032, 70000=0.0023, 100000=0.0022, 250000=0.002, 500000=0.0019 (USD)", RoHS=Yes, Stock=1380000, Supplier="Arrow Electronics"
C4 C13 C15 C16 C19 C27 C28 C29 C32: library part C1005X5R1H104K050BB, "CAP CER 0.1UF 50V X5R 0402", Capacitance=100nF, Case Code (Imperial)=0402, Case Code (Metric)=1005, Dielectric=X5R, Dielectric Material=Ceramic, LCSC Part Number=C2181865, Manufacturer=TDK, Max Operating Temperature=85°C, Min Operating Temperature=-55°C, Package Quantity=1, Supplier Part Number 1=445-5942-1-ND, Tolerance=10%, Voltage=50V, Case/Package=0402, ComponentLink1Description=https://product.tdk.com/info/en/catalog/spec/mlccspec_commercial_general_midvoltage_en.pdf?src-supplier=Digi-Key, ComponentLink1URL=https://product.tdk.com/info/en/catalog/spec/mlccspec_commercial_general_midvoltage_en.pdf?src-supplier=Digi-Key, ComponentLink2Description=http://www.tdk.co.jp/tefe02/e413_c.pdf?src-supplier=Future+Electronics, ComponentLink2URL=http://www.tdk.co.jp/tefe02/e413_c.pdf?src-supplier=Future+Electronics, ComponentLink3Description=https://www.verical.com/server-webapp/html/getDatasheet?partID=743571&src-supplier=Verical, ComponentLink3URL=https://www.verical.com/server-webapp/html/getDatasheet?partID=743571&src-supplier=Verical, ComponentLink4Description=http://www.tdk.co.jp/tefe02/e412_c.pdf?src-supplier=Avnet+Europe, ComponentLink4URL=http://www.tdk.co.jp/tefe02/e412_c.pdf?src-supplier=Avnet+Europe, Construction=Flat, Depth=0.5mm, Height=0.5mm, Item Type=Capacitor, Lead Free="Lead Free", Length=1mm, Manufacturer Part Number=C1005X5R1H104K050BB, Mount="Surface Mount", Packaging="Tape and Reel", Pricing 1="1=0.12, 10=0.09, 50=0.049, 100=0.04, 500=0.02858, 1000=0.02245, 2500=0.02041, 5000=0.01878 (USD)", Radiation Hardening=No, REACH SVHC="No SVHC", Resistor Type=Ceramic, RoHS Compliant=Yes, Series=C, Stock 1=1455182, Supplier 1=Digi-Key, Termination=SMD/SMT, Thickness=0.022inch, Voltage Rating=50V, Voltage Rating (DC)=50V, Weight=2.3E-05oz, Width=0.02inch
C5: library part C1005X5R1V105K050BC, "CAP CER 1UF 35V X5R 0402", Case Code (Imperial)=0402, Case Code (Metric)=1005, Dielectric=X5R, Dielectric Material=Ceramic, Manufacturer=TDK, Max Operating Temperature=85°C, Min Operating Temperature=-55°C, Supplier Part Number=445-9073-1-ND, Tolerance=10%, Voltage Rating=35V, Case/Package=0402, ComponentLink1Description=https://datasheet.ciiva.com/26834/getdatasheetpartid-750449-26834298.pdf?src-supplier=Verical, ComponentLink1URL=https://datasheet.ciiva.com/26834/getdatasheetpartid-750449-26834298.pdf?src-supplier=Verical, ComponentLink2Description=https://datasheet.ciiva.com/28451/1796654-28451087.pdf?src-supplier=Element14, ComponentLink2URL=https://datasheet.ciiva.com/28451/1796654-28451087.pdf?src-supplier=Element14, ComponentLink3Description=https://datasheet.ciiva.com/22719/1796654-22719533.pdf?src-supplier=Element14, ComponentLink3URL=https://datasheet.ciiva.com/22719/1796654-22719533.pdf?src-supplier=Element14, Depth=0.5mm, Item Type=Capacitors, Lead Free="Lead Free", Length=1mm, Manufacturer Part Number=C1005X5R1V105K050BC, Material=4241ConductorMaterial, Mounting Technology="Surface Mount", Packaging="Tape and Reel", Pricing="1=0.15, 10=0.087, 50=0.061, 100=0.0528, 500=0.03898, 1000=0.03468, 2500=0.03011, 5000=0.02735 (USD)", Radiation Hardening=No, Reach SVHC Compliant=No, RoHS=Yes, RoHS Compliant=Yes, Series=C, Stock=682645, Supplier=Digikey
C7 C11: library part CC0402KRX7R0BB103, "CAP CER 10000PF 100V X7R 0402", Case/Package=0402, LCSC Part Number=C527014, Manufacturer=Yageo, Max Operating Temperature=125°C, Min Operating Temperature=-55°C, Tolerance=10%, Voltage Rating=100V, ComponentLink1Description=https://datasheet.octopart.com/CC0402KRX7R0BB103-Yageo-datasheet-166511530.pdf?src-supplier=Future+Electronics, ComponentLink1URL=https://datasheet.octopart.com/CC0402KRX7R0BB103-Yageo-datasheet-166511530.pdf?src-supplier=Future+Electronics, ComponentLink2Description=https://datasheet.octopart.com/CC0402KRX7R0BB103-Yageo-datasheet-153410991.pdf?src-supplier=Farnell, ComponentLink2URL=https://datasheet.octopart.com/CC0402KRX7R0BB103-Yageo-datasheet-153410991.pdf?src-supplier=Farnell, Height=550um, Item Type=Capacitors, Manufacturer Part Number=CC0402KRX7R0BB103, Material=Ceramic, Pricing="10000=0.0098, 20000=0.0097, 30000=0.0092, 50000=0.0091, 100000=0.009, 250000=0.0089 (USD)", RoHS=Yes, RoHS Compliant=Yes, Stock=60000, Supplier="Arrow Electronics"
C8: library part CC0402KRX7R9BB473, "CAP CER 0.047UF 50V X7R 0402", Case Code (Imperial)=0402, Case Code (Metric)=1005, Dielectric=1511DielectricType, LCSC Part Number=C272875, Manufacturer=Yageo, Max Operating Temperature=125°C, Min Operating Temperature=-55°C, Supplier Part Number=2095687, Temperature Coefficient=30ppm/°C, Tolerance=10%, Voltage Rating=50V, Case/Package=0402, Category="Ceramic Capacitors", ComponentLink1Description=https://datasheet.octopart.com/CC0402KRX7R9BB473-Yageo-datasheet-166511530.pdf?src-supplier=Future+Electronics, ComponentLink1URL=https://datasheet.octopart.com/CC0402KRX7R9BB473-Yageo-datasheet-166511530.pdf?src-supplier=Future+Electronics, ComponentLink2Description=http://www.yageo.com/documents/recent/UPY-GPHC_X7R_6.3V-to-50V_18.pdf?src-supplier=Digikey, ComponentLink2URL=http://www.yageo.com/documents/recent/UPY-GPHC_X7R_6.3V-to-50V_18.pdf?src-supplier=Digikey, ComponentLink3Description=https://datasheet.octopart.com/CC0402KRX7R9BB473-Yageo-datasheet-140260305.pdf?src-supplier=Newark, ComponentLink3URL=https://datasheet.octopart.com/CC0402KRX7R9BB473-Yageo-datasheet-140260305.pdf?src-supplier=Newark, Halogen Free=5694HalogenFree, Height=550um, Item Type=Capacitor, Lead Free=5697LeadFree, Length=0.039inch, Manufacturer Part Number=CC0402KRX7R9BB473, Material=4241ConductorMaterial, Mounting Technology="Surface Mount", Packaging="Tape and Reel", Pricing="10000=0.0044, 40000=0.0042, 100000=0.004, 150000=0.0041, 250000=0.0039, 400000=0.0037, 500000=0.0038 (USD)", RoHS=Yes, RoHS Compliant=Yes, Series=CC, Stock=1130000, Supplier="Future Electronics", Thickness=0.022inch, Voltage Rating (DC)=50V, Width=0.02inch
C9: library part CC0402KRX7R9BB182, "CAP CER 1800PF 50V X7R 0402", Case Code (Imperial)=0402, Case Code (Metric)=1005, Dielectric=X7R, LCSC Part Number=C107024, Manufacturer=Yageo, Max Operating Temperature=125°C, Min Operating Temperature=-55°C, Package Quantity=10000, Temperature Coefficient=30ppm/°C, Tolerance=10%, Voltage Rating=50V, Case/Package=0402, ComponentLink1Description=http://www.mouser.com/ds/2/447/Yageo_UPY-GP_NP0_16V-to-50V_9-358835.pdf?src-supplier=Mouser, ComponentLink1URL=http://www.mouser.com/ds/2/447/Yageo_UPY-GP_NP0_16V-to-50V_9-358835.pdf?src-supplier=Mouser, ComponentLink2Description=https://www.verical.com/server-webapp/html/getDatasheet?partID=134311&src-supplier=Verical, ComponentLink2URL=https://www.verical.com/server-webapp/html/getDatasheet?partID=134311&src-supplier=Verical, ComponentLink3Description=https://datasheet.octopart.com/CC0402KRX7R9BB182-Yageo-datasheet-166511530.pdf?src-supplier=Future+Electronics, ComponentLink3URL=https://datasheet.octopart.com/CC0402KRX7R9BB182-Yageo-datasheet-166511530.pdf?src-supplier=Future+Electronics, ComponentLink4Description=http://www.yageo.com/documents/recent/UPY-GPHC_X7R_6.3V-to-50V_18.pdf?src-supplier=Digikey, ComponentLink4URL=http://www.yageo.com/documents/recent/UPY-GPHC_X7R_6.3V-to-50V_18.pdf?src-supplier=Digikey, ComponentLink5Description=https://datasheet.octopart.com/CC0402KRX7R9BB182-Yageo-datasheet-8324192.pdf?src-supplier=Element14, ComponentLink5URL=https://datasheet.octopart.com/CC0402KRX7R9BB182-Yageo-datasheet-8324192.pdf?src-supplier=Element14, ComponentLink6Description=https://datasheet.octopart.com/CC0402KRX7R9BB182-Yageo-datasheet-62336348.pdf?src-supplier=Newark, ComponentLink6URL=https://datasheet.octopart.com/CC0402KRX7R9BB182-Yageo-datasheet-62336348.pdf?src-supplier=Newark, ComponentLink7Description=http://www.yageo.com/documents/recent/UPY-GPHC_X7R_6.3V-to-50V_8.pdf?src-supplier=Avnet, ComponentLink7URL=http://www.yageo.com/documents/recent/UPY-GPHC_X7R_6.3V-to-50V_8.pdf?src-supplier=Avnet, ComponentLink8Description=http://www.yageo.com/documents/recent/UPY-GPHC_X7R_6.3V-to-50V_9.pdf?src-supplier=Future+Electronics, ComponentLink8URL=http://www.yageo.com/documents/recent/UPY-GPHC_X7R_6.3V-to-50V_9.pdf?src-supplier=Future+Electronics, Construction=Flat, Depth=0.5mm, Halogen Free=5694HalogenFree, Height=0.5mm, Item Type=Capacitor, Lead Free=5697LeadFree, Length=1mm, Manufacturer Part Number=CC0402KRX7R9BB182, Material=4241ConductorMaterial, Mounting Technology="Surface Mount", Packaging="Tape and Reel", Pins=2NUMBER, Pricing="10000=0.0028, 40000=0.0026, 150000=0.0025, 300000=0.0024, 750000=0.0023 (USD)", Radiation Hardening=No, RoHS=Yes, RoHS Compliant=Yes, Series=CC, Stock=50000, Supplier="Future Electronics", Termination=SMD/SMT, Voltage Rating (DC)=50V, Width=0.5mm
C10: library part 04025A101JAT2A, "CAP CER 100PF 50V C0G/NP0 0402", Case Code (Imperial)=0402, Case Code (Metric)=1005, Dielectric=C0G, Insulation Resistance=1GR, LCSC Part Number=C597014, Manufacturer="Kyocera AVX", Max Operating Temperature=125°C, Min Operating Temperature=-55°C, Package Quantity=10000, Temperature Coefficient=30ppm/°C, Tolerance=5%, Voltage=50V, Capacitance=100pF, Case/Package=0402, Category="Ceramic Capacitors", ComponentLink1Description=https://datasheet.ciiva.com/11786/0900766b80def0e2-11786618.pdf?src-supplier=RSComponents, ComponentLink1URL=https://datasheet.ciiva.com/11786/0900766b80def0e2-11786618.pdf?src-supplier=RSComponents, ComponentLink2Description=https://datasheet.ciiva.com/1123/493359-1123473.pdf?src-supplier=Element14, ComponentLink2URL=https://datasheet.ciiva.com/1123/493359-1123473.pdf?src-supplier=Element14, ComponentLink3Description=https://datasheet.ciiva.com/1123/493359-1123474.pdf?src-supplier=Element14, ComponentLink3URL=https://datasheet.ciiva.com/1123/493359-1123474.pdf?src-supplier=Element14, ComponentLink4Description=https://datasheet.ciiva.com/16332/ccog-16332501.pdf?src-supplier=Future+Electronics, ComponentLink4URL=https://datasheet.ciiva.com/16332/ccog-16332501.pdf?src-supplier=Future+Electronics, ComponentLink5Description=https://datasheet.ciiva.com/46392/759117-46392007.pdf?src-supplier=Element14, ComponentLink5URL=https://datasheet.ciiva.com/46392/759117-46392007.pdf?src-supplier=Element14, ComponentLink6Description=https://datasheet.ciiva.com/150/ccog-150473.pdf?src-supplier=Digi-Key, ComponentLink6URL=https://datasheet.ciiva.com/150/ccog-150473.pdf?src-supplier=Digi-Key, ComponentLink7Description=https://datasheet.ciiva.com/150/ccog-150474.pdf?src-supplier=Digi-Key, ComponentLink7URL=https://datasheet.ciiva.com/150/ccog-150474.pdf?src-supplier=Digi-Key, ComponentLink8Description=https://datasheet.ciiva.com/2987/ccog-2987642.pdf?src-supplier=Avnet, ComponentLink8URL=https://datasheet.ciiva.com/2987/ccog-2987642.pdf?src-supplier=Avnet, ComponentLink9Description=https://datasheet.ciiva.com/150/ccog-150475.pdf?src-supplier=Digi-Key, ComponentLink9URL=https://datasheet.ciiva.com/150/ccog-150475.pdf?src-supplier=Digi-Key, ComponentLink10Description=https://datasheet.ciiva.com/8083/ccog-8083054.pdf?src-supplier=Avnet, ComponentLink10URL=https://datasheet.ciiva.com/8083/ccog-8083054.pdf?src-supplier=Avnet, ComponentLink11Description=https://datasheet.ciiva.com/5413/ccog-5413647.pdf?src-supplier=Mouser, ComponentLink11URL=https://datasheet.ciiva.com/5413/ccog-5413647.pdf?src-supplier=Mouser, Construction=Flat, Contact Plating=Tin,Matte, Depth=0.5mm, Dissipation Factor=2.5%, Height=0.56mm, Item Type=Capacitor, Lead Free="Lead Free", Length=1mm, Manufacturer Part Number=04025A101JAT2A, Mount="Surface Mount,PCB", Packaging="Tape and Reel", Pricing 1="10000=0.10788, 20000=0.10540, 40000=0.10292, 60000=0.10044, 80000=0.09796, 100000=0.09548, 1000000=0.09424 (USD)", Radiation Hardening=No, Reach SVHC Compliant=Yes, RoHS=Yes, RoHS Compliant=Yes, Series=-, Stock 1=3437500, Supplier 1=Avnet, Supplier Part Number 1=04025A101JAT2A, Termination=SMD/SMT, Thickness=0.013inch, Voltage Rating=50V, Voltage Rating (DC)=50V, Width=0.004inch
C17 C18: library part CL05A475MO5NUNC, "CAP CER 4.7UF 16V X5R 0402", Case Code (Imperial)=0402, Case Code (Metric)=1005, Manufacturer=Samsung, Max Operating Temperature=85°C, Min Operating Temperature=-55°C, Tolerance=20%, Voltage Rating=16V, Capacitance=4.7uF, Case/Package=0402, Category="Ceramic Capacitors", ComponentLink1Description=http://www.farnell.com/datasheets/2710653.pdf?src-supplier=Farnell, ComponentLink1URL=http://www.farnell.com/datasheets/2710653.pdf?src-supplier=Farnell, ComponentLink2Description=http://www.samsungsem.com/kr/support/product-search/mlcc/CL05A475MO5NUNC.jsp?src-supplier=Digikey, ComponentLink2URL=http://www.samsungsem.com/kr/support/product-search/mlcc/CL05A475MO5NUNC.jsp?src-supplier=Digikey, ComponentLink3Description=http://www.farnell.com/datasheets/2710653.pdf?src-supplier=Element14, ComponentLink3URL=http://www.farnell.com/datasheets/2710653.pdf?src-supplier=Element14, ComponentLink4Description=https://datasheet.octopart.com/CL05A475MO5NUNC-Samsung-Electro-Mechanics-datasheet-123102911.pdf?src-supplier=Future+Electronics, ComponentLink4URL=https://datasheet.octopart.com/CL05A475MO5NUNC-Samsung-Electro-Mechanics-datasheet-123102911.pdf?src-supplier=Future+Electronics, ComponentLink5Description=http://www.farnell.com/datasheets/2710653.pdf?src-supplier=Newark, ComponentLink5URL=http://www.farnell.com/datasheets/2710653.pdf?src-supplier=Newark, Height=550um, Length=0.039inch, Manufacturer Part Number=CL05A475MO5NUNC, Material=4241ConductorMaterial, Mount="Surface Mount", Packaging="Cut Tape", Pricing 1="10000=0.09712 (USD)", RoHS=Yes, RoHS Compliant=Yes, Series=CL, Stock 1=50000, Supplier 1=Avnet, Supplier Part Number 1=CL05A475MO5NUNC, Thickness=0.022inch, Voltage Rating (DC)=16V, Width=0.02inch
C20 C21: library part CC0402JRNPO9BN101, "CAP CER 100PF 50V C0G/NPO 0402", Case Code (Imperial)=0402, Case Code (Metric)=1005, Dielectric=C0G, Dielectric Material=Ceramic, Insulation Resistance=100GR, LCSC Part Number=C106200, Manufacturer=Yageo, Max Operating Temperature=125°C, Min Operating Temperature=-55°C, Package Quantity=1, Supplier Part Number=8934564, Temperature Coefficient=30ppm/°C, Tolerance=5%, Voltage=50V, Case/Package=0402, Category="Ceramic Capacitors", ComponentLink1Description=https://datasheet.ciiva.com/11786/0900766b80d84fbf-11786101.pdf?src-supplier=Rs, ComponentLink1URL=https://datasheet.ciiva.com/11786/0900766b80d84fbf-11786101.pdf?src-supplier=Rs, ComponentLink2Description=https://datasheet.ciiva.com/23767/25787-23767888.pdf?src-supplier=Newark, ComponentLink2URL=https://datasheet.ciiva.com/23767/25787-23767888.pdf?src-supplier=Newark, ComponentLink3Description=https://datasheet.ciiva.com/28450/1443161-28450220.pdf?src-supplier=Element14, ComponentLink3URL=https://datasheet.ciiva.com/28450/1443161-28450220.pdf?src-supplier=Element14, ComponentLink4Description=https://datasheet.ciiva.com/8033/1443161-8033598.pdf?src-supplier=Element14, ComponentLink4URL=https://datasheet.ciiva.com/8033/1443161-8033598.pdf?src-supplier=Element14, ComponentLink5Description=https://datasheet.ciiva.com/143/mlccorderingcode-143990.pdf?src-supplier=Digi-Key, ComponentLink5URL=https://datasheet.ciiva.com/143/mlccorderingcode-143990.pdf?src-supplier=Digi-Key, ComponentLink6Description=https://datasheet.ciiva.com/143/mlccorderingcode-143989.pdf?src-supplier=Digi-Key, ComponentLink6URL=https://datasheet.ciiva.com/143/mlccorderingcode-143989.pdf?src-supplier=Digi-Key, ComponentLink7Description=https://datasheet.ciiva.com/143/mlccorderingcode-143991.pdf?src-supplier=Digi-Key, ComponentLink7URL=https://datasheet.ciiva.com/143/mlccorderingcode-143991.pdf?src-supplier=Digi-Key, Depth=0.5mm, Height=0.5mm, Item Type=Capacitor, Lead Free="Lead Free", Length=1mm, Manufacturer Part Number=CC0402JRNPO9BN101, Mounting Technology="Surface Mount", Packaging="Tape and Reel", Pins=2, Pricing="10000=0.002, 40000=0.0019, 150000=0.0018, 400000=0.0018, 1000000=0.0017 (USD)", Radiation Hardening=No, Reach SVHC Compliant=No, RoHS=Yes, RoHS Compliant=Yes, Series=CC, Stock=11720000, Supplier="Future Electronics", Termination=SMD/SMT, Thickness=0.022inch, Voltage Rating=50V, Voltage Rating (DC)=50V, Width=0.02inch
C22: library part GRM158R61A226ME15D, "CAP CER 22UF 10V X5R 0402", Case/Package=343Case, Dielectric=1537DielectricType, LCSC Part Number=C3845593, Manufacturer=Murata, Max Operating Temperature=85°C, Min Operating Temperature=-55°C, Supplier Part Number=81-GRM158R61A226ME5D, Tolerance=20%, Voltage Rating=10V, Category="Ceramic Capacitors", Height=800um, Item Type=Capacitor, Length=1mm, Manufacturer Part Number=GRM158R61A226ME15D, Material=4241ConductorMaterial, Pricing="1=0.46, 10=0.225, 50=0.225, 100=0.146, 1000=0.124, 10000=0.106 (USD)", RoHS=Yes, Stock=328944, Supplier=Mouser, Thickness=800um, Voltage Rating (DC)=10V, Width=500um
C23 C24 C25 C26 C31: library part CC0402MRX5R6BB106, "CAP CER 10UF 10V X5R 0402", Case Code (Imperial)=0402, Case Code (Metric)=1005, LCSC Part Number=C962143, Manufacturer=Yageo, Max Operating Temperature=85°C, Min Operating Temperature=-55°C, Supplier Part Number 1=6097631, Tolerance=20%, Voltage Rating=10V, Capacitance=10uF, Case/Package=0402, Category="Ceramic Capacitors", ComponentLink1Description=http://www.yageo.com/documents/recent/UPY-GPHC_X5R_4V-to-50V_25.pdf?src-supplier=Digi-Key, ComponentLink1URL=http://www.yageo.com/documents/recent/UPY-GPHC_X5R_4V-to-50V_25.pdf?src-supplier=Digi-Key, Item Type=Capacitor, Manufacturer Part Number=CC0402MRX5R6BB106, Mount="Surface Mount", Packaging="Tape and Reel", Pricing 1="10000=0.02650, 20000=0.02590, 30000=0.02550, 40000=0.02530, 50000=0.02450 (USD)", RoHS=Yes, RoHS Compliant=Yes, Stock 1=80000, Supplier 1="Future Electronics"
C30: library part C1005X5R1V225K050BC, "CAP CER 2.2UF 35V X5R 0402", Case Code (Imperial)=0402, Case Code (Metric)=1005, Dielectric=X5R, Dielectric Material=Ceramic, Manufacturer=TDK, Max Operating Temperature=85°C, Min Operating Temperature=-55°C, Package Quantity=1, Supplier Part Number=445-9028-1-ND, Tolerance=10%, Voltage Rating=35V, Case/Package=0402, ComponentLink1Description=https://datasheet.ciiva.com/24218/mlcc-commercial-general-en-24218938.pdf?src-supplier=Mouser, ComponentLink1URL=https://datasheet.ciiva.com/24218/mlcc-commercial-general-en-24218938.pdf?src-supplier=Mouser, Depth=0.5mm, Height=0.5mm, Item Type=Capacitors, Lead Free="Lead Free", Length=1mm, Manufacturer Part Number=C1005X5R1V225K050BC, Material=4241ConductorMaterial, Mounting Technology="Surface Mount", Packaging="Tape and Reel", Pricing="1=0.21, 10=0.123, 50=0.0866, 100=0.0754, 500=0.05646, 1000=0.05055, 2500=0.04429, 5000=0.04049 (USD)", Reach SVHC Compliant=Unknown, RoHS=Yes, RoHS Compliant=Yes, Series=C, Stock=1458755, Supplier=Digikey, Termination=SMD/SMT, Thickness=0.022inch, Voltage Rating (DC)=35V, Weight=2.3E-05oz, Width=0.02inch
CR1 CR2: "Single-line low capacitance and low leakage current ESD protection", Manufacturer_Name=STMicroelectronics, Copyright="Copyright (C) 2025 Ultra Librarian. All rights reserved.", Manufacturer_Part_Number=ESDALCL5-1BM2, RefDes=RefDes, Type=Type
D1 D2: "40V 500mV@2A 2A SMA(DO-214AC) Schottky Barrier Diodes (SBD) ROHS", LCSC Part Number=C2886579, Manufacturer="Guangdong Hottech", Package=SMA(DO-214AC), ComponentLink1Description=LCSC, ComponentLink1URL=https://www.lcsc.com/product-detail/Schottky-Barrier-Diodes-SBD_Guangdong-Hottech-SS24A_C2886579.html, Manufacturer Part Number=SS24A
D4: "40V Independent Type 1A 550mV@1A SMA(DO-214AC) Schottky Diodes ROHS", LCSC Part Number=C2480, Manufacturer="MDD(Microdiode Semiconductor)", Package=SMA(DO-214AC), ComponentLink1Description=LCSC, ComponentLink1URL=https://www.lcsc.com/product-detail/Schottky-Diodes_MDD-Microdiode-Semiconductor-SS14_C2480.html?s_z=n_C2480, Item Type=Diode, Manufacturer Part Number=SS14
J1 J3: library part "4P Through Hole Pads", "Wire Connecting Pads", Item Type="Through Hole Pads", Manufacturer Part Number="4P Through Hole Pads"
J2: "CONN FFC FPC 10POS 0.5MM R/A", Actuator Color=Black, Current Rating=500mA, Flammability Rating="UL94 V-0", Housing Color=White, Manufacturer=Molex, Max Operating Temperature=85°C, Max Voltage Rating (AC)=50V, Min Operating Temperature=-40°C, Package Quantity=3000, Supplier Part Number=538-503480-1000, Actuator Material=Nylon,Glass,Polyamide, ComponentLink1Description=https://datasheet.ciiva.com/26916/getdatasheetpartid-735332-26916946.pdf?src-supplier=Verical, ComponentLink1URL=https://datasheet.ciiva.com/26916/getdatasheetpartid-735332-26916946.pdf?src-supplier=Verical, ComponentLink2Description=https://datasheet.ciiva.com/5137/5034801000-ffc-fpc-connectors-179433-5137762.pdf?src-supplier=Mouser, ComponentLink2URL=https://datasheet.ciiva.com/5137/5034801000-ffc-fpc-connectors-179433-5137762.pdf?src-supplier=Mouser, ComponentLink3Description=https://datasheet.ciiva.com/671/5034801000-sd-671179.pdf?src-supplier=Digikey, ComponentLink3URL=https://datasheet.ciiva.com/671/5034801000-sd-671179.pdf?src-supplier=Digikey, Contact Material=Bronze, Contact Plating=Gold, Depth=3.6mm, ELV=5681ELVCompliant, Gender=Receptacle, Halogen Free=5696HalogenFree, Housing Material=Polymer, Item Type="FFC / FPC", Length=6.7mm, Manufacturer Part Number=503480-1000, Material=150ConductorMaterial, Mating Cycles=10, Max Voltage Rating (DC)=50V, Number of Circuits=10, Number of Contacts=10, Number of Positions=10, Number of Rows=1, Orientation="Right Angle", Packaging="Tape and Reel", Pitch=0.5mm, Plating=157ConductorMaterial, Pricing="1=0.99, 10=0.737, 50=0.737, 100=0.64, 1000=0.559, 10000=0.465 (USD)", Radiation Hardening=No, Reach SVHC Compliant=Unknown, RoHS=Yes, Series="BackFlip, Easy-On 503480", Stackable=No, Stock=11378, Supplier=Mouser, Termination=Solder, Voltage Rating=50V, Voltage Rating (AC)=50V, Wire/Cable Type=Straight
J4 J5 J6 J7: library part 1.27-1*2P, "3A Direct Insert Policy 1.7mm 2P 3mm -55℃~+105℃ 2.5mm 1.27mm Single Row Black Brass 1x2P Plugin,P=1.27mm Pin Headers ROHS", LCSC Part Number=C703015, Manufacturer="BOOMELE(BOOM Precision Elec)", Package=Plugin,P=1.27mm, ComponentLink1Description=LCSC, ComponentLink1URL=https://www.lcsc.com/product-detail/Pin-Headers_BOOMELE-Boom-Precision-Elec-1-27-1-2P_C703015.html, Item Type=Male, Manufacturer Part Number=1.27-1*2P
L1: library part MAKK2016T2R2M, "FIXED IND 2.2UH 1.5A 160MOHM SMD", Case Code (Imperial)=0806, Case Code (Metric)=2016, Current Rating=1.5A, DC Resistance (DCR)=160mR, LCSC Part Number=C92923, Manufacturer="Taiyo Yuden", Max Operating Temperature=105°C, Min Operating Temperature=-40°C, Package Quantity=3000, Resistor Type=Wirewound, Supplier Part Number 1=963-MAKK2016T2R2M, Test Frequency=2MHz, Tolerance=20%, Case/Package=0806, Category="Fixed Inductors", ComponentLink1Description=https://datasheet.ciiva.com/30014/makk2016t2r2m-ss-30014449.pdf?src-supplier=Avnet, ComponentLink1URL=https://datasheet.ciiva.com/30014/makk2016t2r2m-ss-30014449.pdf?src-supplier=Avnet, Core Material=Metal, Depth=1.6mm, Halogen Free="Halogen Free", Height=1mm, Height - Seated (Max)=0.039inch, Inductance=2.2uH, Item Type=Inductor, Length=0.079inch, Manufacturer Part Number=MAKK2016T2R2M, Max DC Current=1.5A, Mount="Surface Mount", Packaging="Tape and Reel", Pricing 1="1=0.27000, 10=0.17200, 50=0.17200, 100=0.14000, 1000=0.10600, 10000=0.09200 (USD)", Radiation Hardening=No, RoHS=Yes, RoHS Compliant=Yes, Saturation Current=1.5A, Shielding=Shielded, Stock 1=64320, Supplier 1=Mouser, Termination=SMD/SMT, Width=0.063inch
L2: library part NR3015T2R2M, "FIXED IND 2.2UH 1.5A 72 MOHM SMD", Case/Package=3015, Current Rating=1.48A, DC Resistance (DCR)=72mR, Inductance Tolerance=20%, LCSC Part Number=C86423, Manufacturer="Taiyo Yuden", Max DC Current=1.5A, Max Operating Temperature=120°C, Min Operating Temperature=-25°C, Package Quantity=1, Self Resonant Frequency=64MHz, Test Frequency=100kHz, ComponentLink1Description=https://datasheet.ciiva.com/8002/1734585-8002131.pdf?src-supplier=Element14, ComponentLink1URL=https://datasheet.ciiva.com/8002/1734585-8002131.pdf?src-supplier=Element14, ComponentLink2Description=https://datasheet.ciiva.com/8002/nr3015t2r2m-ss-8002130.pdf?src-supplier=Element14, ComponentLink2URL=https://datasheet.ciiva.com/8002/nr3015t2r2m-ss-8002130.pdf?src-supplier=Element14, ComponentLink3Description=https://datasheet.ciiva.com/8499/nr3015t2r2m-ss-8499257.pdf?src-supplier=Avnet, ComponentLink3URL=https://datasheet.ciiva.com/8499/nr3015t2r2m-ss-8499257.pdf?src-supplier=Avnet, ComponentLink4Description=https://datasheet.ciiva.com/15988/279nr3015t2r2m-15988078.pdf?src-supplier=Onlinecomponents.com, ComponentLink4URL=https://datasheet.ciiva.com/15988/279nr3015t2r2m-15988078.pdf?src-supplier=Onlinecomponents.com, ComponentLink5Description=https://datasheet.ciiva.com/1043/wound04-e-1043235.pdf?src-supplier=Digikey, ComponentLink5URL=https://datasheet.ciiva.com/1043/wound04-e-1043235.pdf?src-supplier=Digikey, ComponentLink6Description=https://datasheet.ciiva.com/1043/wound04-e-1043234.pdf?src-supplier=Digikey, ComponentLink6URL=https://datasheet.ciiva.com/1043/wound04-e-1043234.pdf?src-supplier=Digikey, ComponentLink7Description=https://datasheet.ciiva.com/1043/wound04-e-1043236.pdf?src-supplier=Digikey, ComponentLink7URL=https://datasheet.ciiva.com/1043/wound04-e-1043236.pdf?src-supplier=Digikey, Core Material=Ferrite, ESR=72mR, Halogen Free="Halogen Free", Height=1.5mm, Height - Seated (Max)=0.059inch, Item Type=Inductor, Lead Free="Lead Free", Length=0.118inch, Manufacturer Part Number=NR3015T2R2M, Packaging="Tape and Reel", Pins=2, Pricing="1=0.32, 10=0.263, 25=0.2424, 50=0.2222, 100=0.1959, 250=0.18988, 500=0.16968, 1000=0.13736 (USD)", Reach SVHC Compliant=Unknown, RMS Current (Irms)=1.5A, RoHS=Yes, RoHS Compliant=Yes, Saturation Current=1.48A, Series=NR, Shielding=Shielded, Stock=131557, Supplier=Digikey, Termination=SMD/SMT, Tolerance=20%, Width=0.118inch
LED1 LED2 LED3 LED5 LED6 LED7: library part XZMDK68W-2, "LED RED CLEAR CHIP SMD", Case Code (Imperial)=0402, Case Code (Metric)=1005, Forward Voltage=1.95V, Lens Color=Colorless, Manufacturer=SunLED, Supplier Part Number 1=1497-1174-6-ND, Test Current=20mA, Case/Package=0402, Color=Red, ComponentLink1Description=http://www.sunledusa.com/products/spec/XZMDK68W-2.pdf?src-supplier=Digi-Key, ComponentLink1URL=http://www.sunledusa.com/products/spec/XZMDK68W-2.pdf?src-supplier=Digi-Key, ComponentLink2Description=https://www.sunledusa.com/products/spec/XZMDK68W-2.pdf?src-supplier=Digi-Key, ComponentLink2URL=https://www.sunledusa.com/products/spec/XZMDK68W-2.pdf?src-supplier=Digi-Key, Dominant Wavelength=630nm, Height=0.6mm, Item Type=LED, Length=1mm, Lens Transparency=Clear, Luminous Intensity=69mcd, Manufacturer Part Number=XZMDK68W-2, Mount="Surface Mount", Packaging="Tape and Reel", Pricing 1="1=0.43, 10=0.306, 100=0.136, 500=0.0952, 1000=0.0782 (USD)", Stock 1=69539, Supplier 1=Digi-Key, Viewing Angle=120°, Width=0.5mm
Q1 Q2: "30V 5.8A 32mΩ@10V,5.8A 1.4W 1.4V@250uA N Channel SOT-23 MOSFETs ROHS", LCSC Part Number=C344010, Manufacturer=BORN, ComponentLink1Description=LCSC, ComponentLink1URL=https://www.lcsc.com/product-detail/MOSFETs_BORN-AO3400A_C344010.html, Item Type=Mosfet, Manufacturer Part Number=AO3400A
Q3: "Trans Mosfet P-ch 30V 4A 3-PIN SOT-23 T/r", Case/Package=TO-236-3, Continuous Drain Current (ID)=4A, Drain to Source Voltage (Vdss)=30V, Input Capacitance=1.2nF, LCSC Part Number=C181091, Manufacturer="Alpha & Omega Semiconductor", Manufacturer Part Number=AO3401A, Max Operating Temperature=150°C, Max Power Dissipation=1.4W, Min Operating Temperature=-55°C, Category=MOSFETs, ComponentLink1Description=https://datasheet.ciiva.com/940/ao3401a-940720.pdf?src-supplier=Digi-Key, ComponentLink1URL=https://datasheet.ciiva.com/940/ao3401a-940720.pdf?src-supplier=Digi-Key, ComponentLink2Description=https://datasheet.ciiva.com/26927/getdatasheetpartid-79048-26927888.pdf?src-supplier=Verical, ComponentLink2URL=https://datasheet.ciiva.com/26927/getdatasheetpartid-79048-26927888.pdf?src-supplier=Verical, Item Type=Mosfet, Lead Free="Lead Free", Mount="Surface Mount", Number of Elements=1, Number of Pins=3, Packaging="Tape and Reel", Power Dissipation=1.4W, Radiation Hardening=No, Rds On Max=44mR, RoHS=Yes, RoHS Compliant=Yes, Series=-, Supplier 1="Arrow Electronics", Supplier Part Number 1=AO3401A